# Altium PCB Light_SPT_Device_v1.0.PcbDoc (part 4 of 4)
Units mil, origin at the board's own origin, x right, y up, seen from the top; angles counter-clockwise.
Board outline 3454 x 2460 mil, 2 copper layers (Top Layer, Bottom Layer), stack 57 mil thick; 156 components, 115 nets, 552 pads, 270 vias.
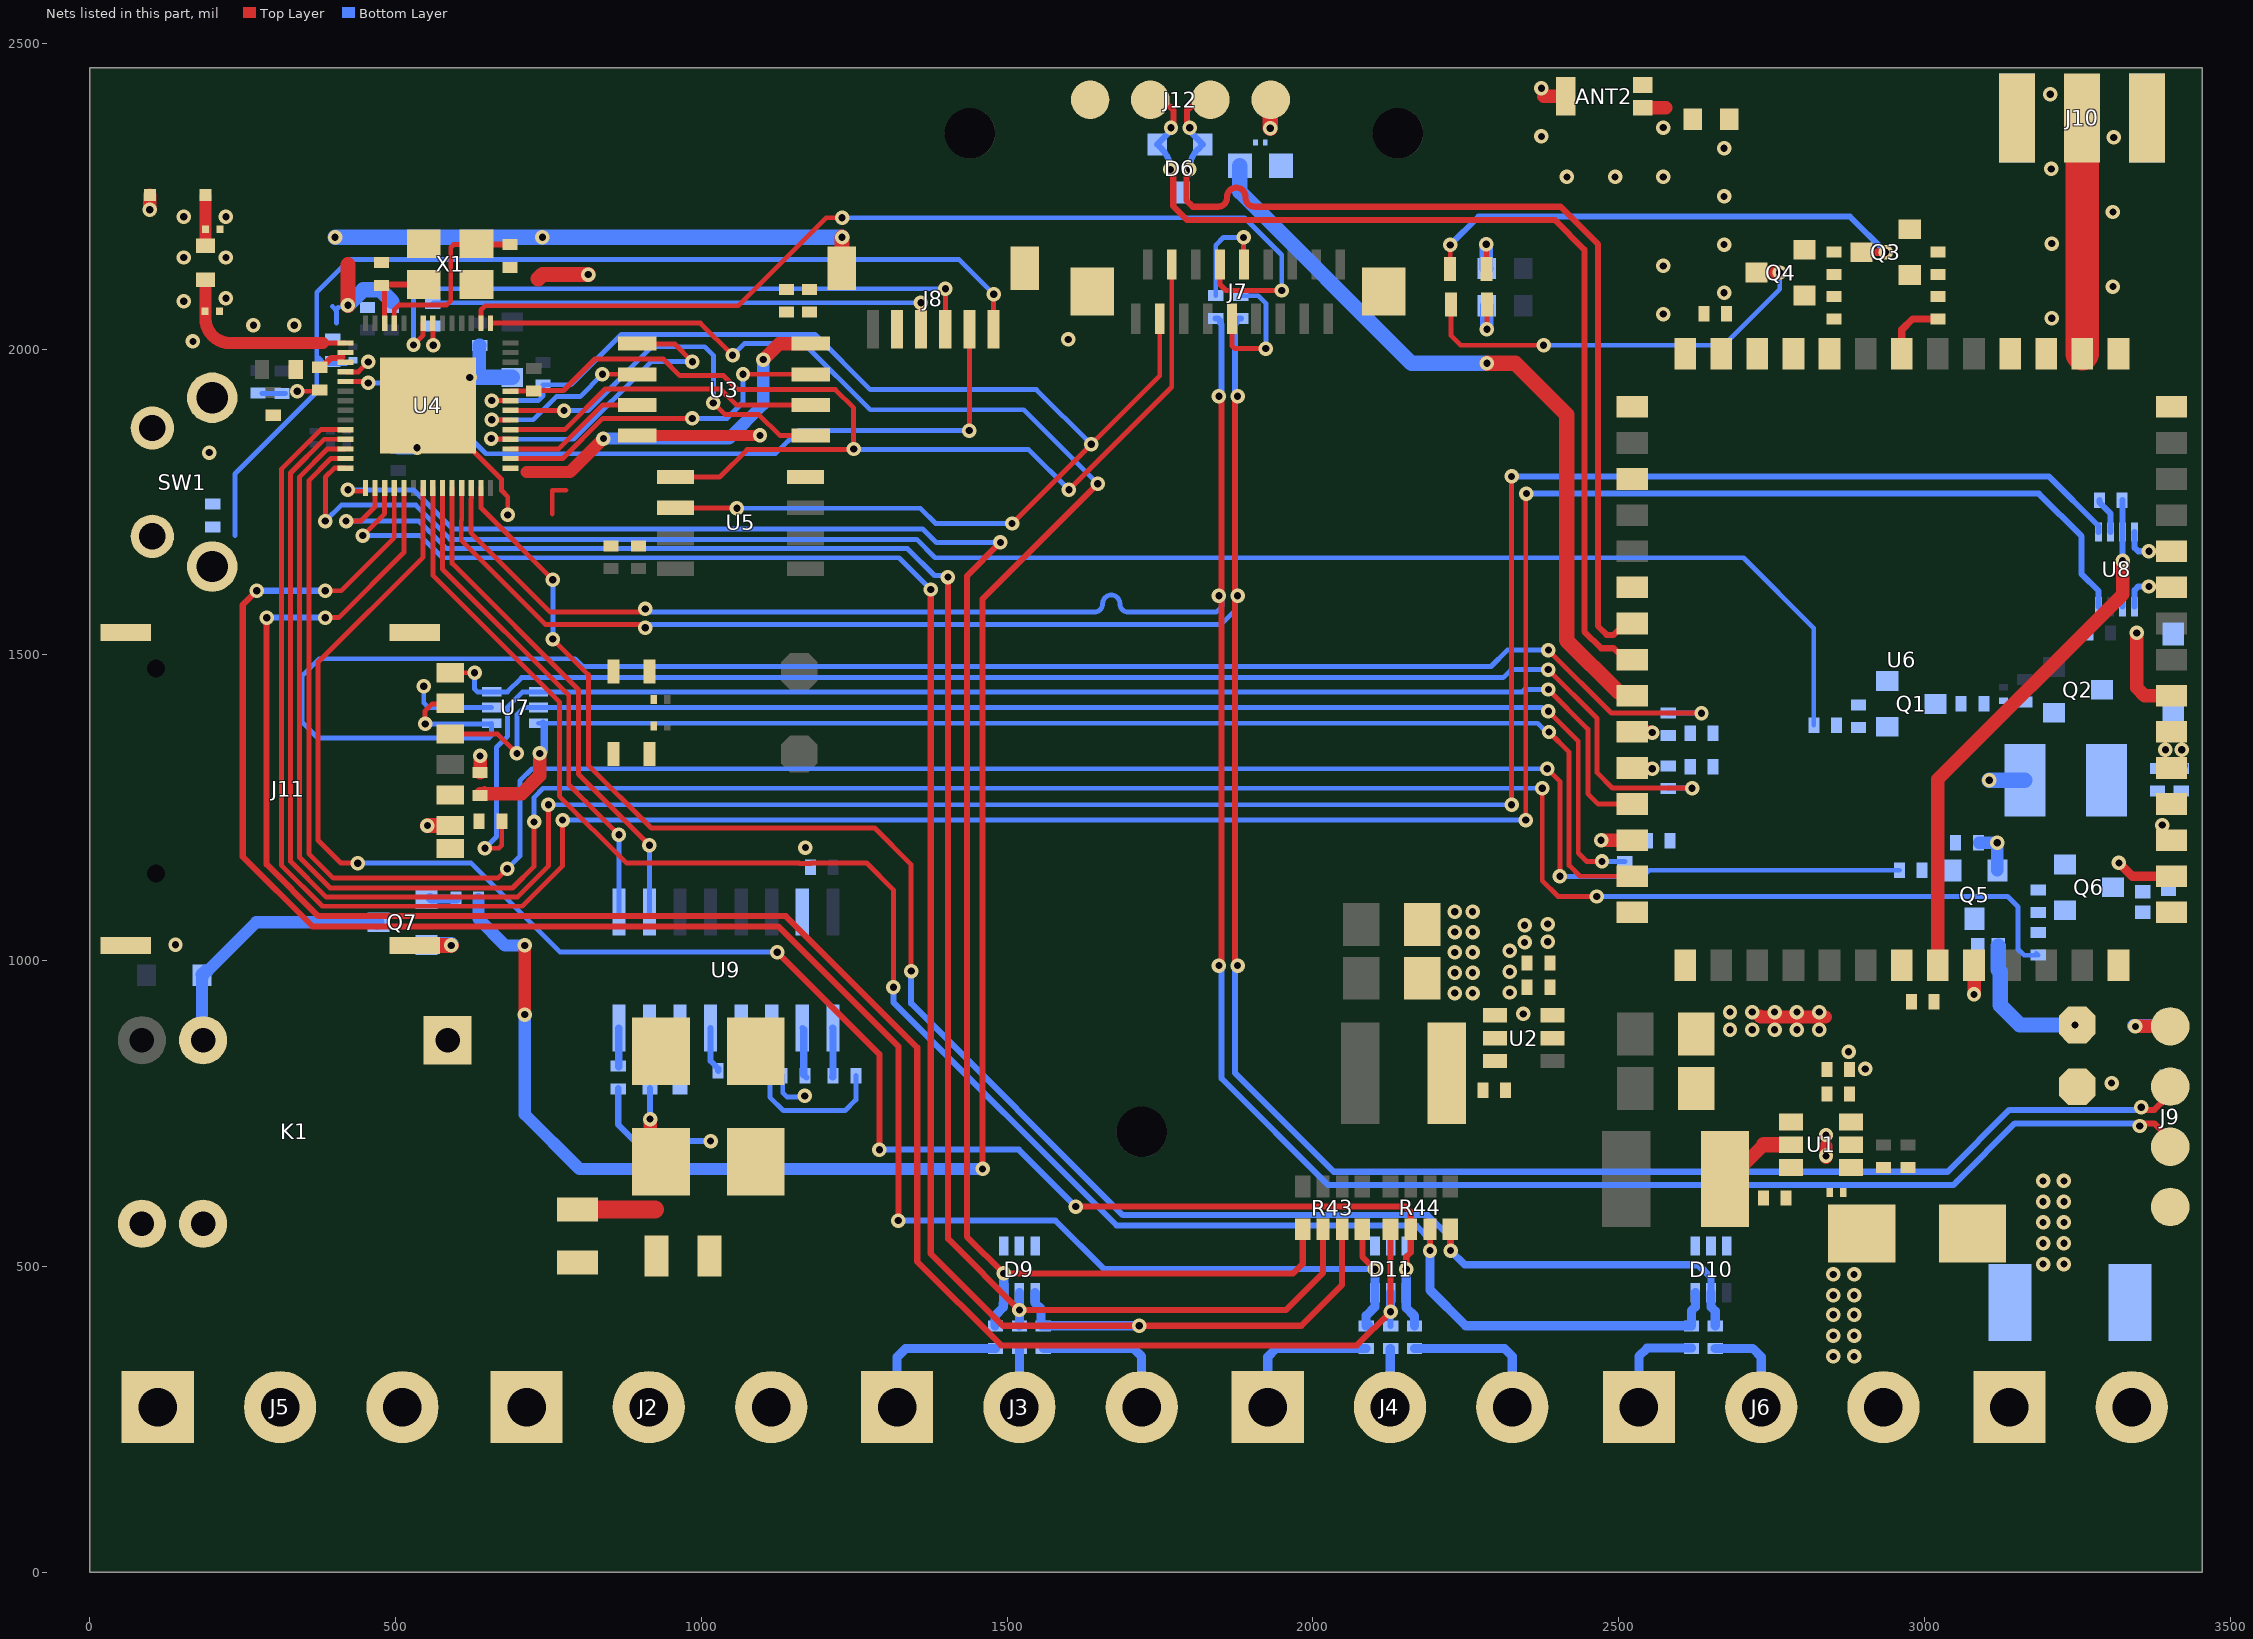
[diagram p2: the nets of this part, all layers, seen from the top]

## Via types
v1: diameter 23.62, hole 11.81, Top Layer to Bottom Layer, tented both sides, 204 vias
v2: diameter 23.62, hole 11.81, Top Layer to Bottom Layer, 66 vias

## Nets (pads, with @x,y where several pads share a name; then routed paths per layer and width w, separated by ;. In a path a pad name is that pad's centre, name@x,y a point inside that pad or via, vN(x,y) a via of type N, cw(c..) or ccw(c..) an arc to the next point about the centre after c; other vN are vias at no path point) (continued)
EN: C23.2 C24.2 J8.6 R8.1 SW1.2 SW1.3 U4.4 | length 1755.3
  Top Layer w8: U4.4@418.02,1962.96 439.09,1962.96 v1(455.31,1979.19) ; J8.6@1478,2033.52 1477.74,2033.78 1477.74,2089.74 v1(1478,2090)
  Bottom Layer w8: 237,1695.34 237,1796 371,1930 371,1986 371,2093 425,2147 1421,2147 v1(1478,2090) ; 374,1986 383.52,1976.48 418.5,1976.48
GND: Ant1.GND ANT2.2 ANT2.3 C2.1 C3.1 C5.1 C6.1 C8.1 C9.1 C10.1 C11.1 C12.1 C13.1 C14.1 C15.1 C16.1 C17.1 C18.1 C19.1 C20.1 C21.1 C22.1 C23.1 C24.1 C25.1 C26.1 C27.1 C28.1 C31.2 C32.1 C33.1 C34.1 C35.1 C36.1 C37.2 C38.2 C39.1 C40.1 C41.2 C42.2 C43.2 C46.2 C47.2 C48.1 C49.1 D1.1 D3.2 D4.1 D5.1 D6.3 D7.2 D8.2 D9.1 D9.2 D9.3 D10.1 D10.2 D10.3 D11.1 D11.2 D11.3 D13.1 D14.1 J1.1 J2.3 J6.3 J7.MP1 J7.MP2 J8.2 J8.MP1 J8.MP2 J9.4 J10.2 J10.3 J10.4 J10.5 J11.1 J11.2 J11.3 J11.4 J11.C5 J12.4 LED1.2 LED2.2 P4.1 Q1.2 Q3.2 Q4.2 Q5.2 Q6.2 Q7.2 R3.1 R17.1 R23.1 R27.1 R29.1 R31.1 SW1.1 SW1.4 U1.4 U2.4 U3.4 U4.57 U5.4 U6.1 U6.3 U6.6 U6.15 U6.16 U6.22 U6.28 U6.29 U6.31 U6.32 U6.35 U6.43 U6.44 U6.46 U6.47 U6.53 U6.54 U6.56 U7.2 U8.2 U9.15 X1.2 X1.4 | length 3052.9
  Top Layer w8: v1@337.93,1931.19 v1(338.93,1931.19) 373.69,1931.19 C18.1@376,1933.5 ; U4.57@552.87,1907.84 673.05,1787.66 673.05,1769.1 683.34,1758.81 v1(683.34,1729) v1@682.38,1729.96 ; 756,1730.36 756,1769.36 778.24,1769.36 ; v1(1600,2016) v1@1602,2018
  Top Layer w18: U3.4@895,1859 v1(1095.74,1859)
  Top Layer w22: v1(98,2228.19) Ant1.GND@98,2252 ; C38.2@638,1307.5 v2(638,1335) ; J7.MP2@2115.65,2094.13 J7.MP2@2116,2093.78 ; 2377.43,2413.43 ANT2.3@2413.49,2413.43 ; ANT2.2@2539.47,2394.73 2577,2394.73 ; 2731,909 2732,908 2838,908 ; v2@2839,678.81 v2(2839,680.81) 2839,697 ; v1(3347,1536) 3347,1446.22 3359.89,1433.33 U6.35@3403.89,1433.33
  Top Layer w25: v1(422,2072) 422,2138 ; J11.2@547,1025 v1(591,1025) ; v1(552,1221) 589.45,1221 J11.C5@589.5,1220.95 ; 733,2115 740,2122 v1(815,2122) ; J8.MP1@1229.45,2132.41 1230,2132.96 v1(1230,2183)
  Bottom Layer w8: C16.1@281,1928 281.25,1927.75 319.75,1927.75 C17.1@320,1927.5 ; 397.02,2069.59 402.31,2064.3 ; 401.81,2063.79 402.31,2064.3 ; 403.51,2042.37 403.51,2062.09 ; 406.52,2068.5 402.31,2064.3 ; v1(546,1449) 546,1421.69 553.69,1414 U7.2@657,1414 ; C47.2@1133,812 1133,784 1139.69,777.31 1167.31,777.31 v1(1169,779)
  Bottom Layer w10: C41.2@3286,1753 3286,1749.5 3304,1731.5 3304,1701.36 U8.2@3304.31,1701.05
  Bottom Layer w20: R29.1@3089,1193 v1(3119,1193) v1@3120,1193 ; Q5.2@3119,1147.77 v1@3119,1192.02
  Bottom Layer w22: C25.1@504,1838.5 504.25,1838.75 534.75,1838.75 v1(535,1839) ; v1@621.38,1954.24 636.83,1969.69 636.83,2006.2 C12.1@637.71,2006.2
  Bottom Layer w25: v1(401,2183) v1(740,2183) v1(1230,2183) ; v1(422,2072) 447,2097 475,2097 494,2078 ; Q7.2@550.51,1025.6 550.91,1026 v1@591,1026 ; v1(621.07,1953.93) D3.2@690.71,1953.93 ; v1(3106,1295) C31.2@3164.14,1295 ; D7.2@3120.73,1024 3120.73,985.27 C39.1@3124,982 3124,927 3156,895 v1(3246,895)
  other v1: 140,1026 1170,1185 3389,1221.89 195,1831 168.47,2012.81 267.37,2039.02 333.99,2039.02 3208.24,2050.67 2572.76,2057.49 153.54,2078.47 222.44,2083.36 2672.24,2092.41 3308.2,2102.34 2572.76,2136.23 153.54,2149.97 222.44,2149.97 2672.24,2171.15 3208.24,2172.72 153.54,2216.59 222.44,2216.59 3308.2,2224.39 2672.24,2249.89 2415.28,2281.71 2494.02,2281.71 2572.76,2281.71 3207.2,2294.76 2672.24,2328.63 3309.39,2346.43 2373.57,2348 2572.76,2362.45 3205.86,2416.8 2373.57,2426.74
  other v2: 2851,353 2885,353 2851,387 2885,387 2851,421 2885,421 2851,453 2885,453 2851,487 2885,487 2839,715 2682,887 2718.5,887 2755,887 2791.5,887 2828,887 2344,913 2682,916 2718.5,916 2755,916 2791.5,916 2828,916 2232,947 2261,947 2322,948 2232,980.25 2261,980.25 2322,982 2232,1013.5 2261,1013.5 2322,1016 2346,1030 2232,1046.75 2261,1046.75 2346,1058 2232,1080 2261,1080
GNSS_ANT: ANT2.1 C28.2 C29.2
GSM_BUCK_EN: R16.2 U4.14 | length 2798
  Top Layer w8: v1(385,1719) 385,1791 399.48,1805.48 U4.14@418.02,1805.48
  Bottom Layer w8: v1(385,1719) 411,1745 532.97,1745 588.97,1689 1352,1689 1382,1659 2704,1659 2819,1544 R16.2@2819,1385
GSM_PWR_EN: R30.2 U4.12 | length 3957.1
  Top Layer w8: U4.12@418.02,1836.98 388.55,1836.98 343,1791.43 343,1168.79 392.79,1119 691,1119 726.3,1154.3 v1(726.3,1227) ; v1(2375,1282) 2375,1131 2401,1105 v1(2464,1105)
  Bottom Layer w8: v1(726.3,1227) 726.3,1267.3 741,1282 v1(2375,1282) ; v1(2464,1105) 3136,1105 3153,1088 3153,1019 3163,1009 R30.2@3182.84,1009 ; R30.2@3182.84,1012.16 R30.2@3186,1009
GSM_RST: R28.2 U4.13 | length 3616.9
  Top Layer w8: U4.13@418.02,1821.23 394.02,1821.23 358,1785.21 358,1175 398,1135 667,1135 v1(682.3,1150.3) ; v1(2383.13,1313.99) 2403.81,1293.31 v1(2403.81,1138)
  Bottom Layer w8: v1(682.3,1150.3) 703,1171 703,1294 722.99,1313.99 v1(2383.13,1313.99) ; v1(2403.81,1138) 2540,1138 2550,1148 R28.2@2959,1148
GSM_RX: U6.39 U8.4 | length 97.3
  Top Layer w10: v1(3367,1669.55) U6.39@3403.89,1669.55 U6.39@3412.89,1669.55
  Bottom Layer w10: U8.4@3343.69,1701.05 3343.69,1675.41 3349.54,1669.55 v1(3367,1669.55)
GSM_TX: U6.38 U8.5 | length 99.4
  Top Layer w10: v1(3367,1612) 3411.39,1612 U6.38@3412.89,1610.5
  Bottom Layer w10: U8.5@3343.69,1579 3343.69,1606.14 3349.54,1612 v1(3367,1612)
GSM_USB_D_N: D6.2 J12.2 U6.7 | length 1648.4
  Top Layer w10: v1(1798,2294) ccw(c1808.86,2283.14) 1793.5,2283.14 1793.5,2243 1799.54,2236.96 1803.5,2233 1844.57,2233 ccw(c1844.57,2248) 1859.57,2248 1859.57,2249.32 cw(c1874.57,2249.32) 1889.57,2249.32 1889.57,2248 ccw(c1904.57,2248) 1904.57,2233 1939.57,2233 2405.11,2233 2466,2172.11 2466,1547.39 2480.47,1532.91 2491.66,1532.91 2510.19,1551.44 U6.7@2522,1551.44 ; v1(1798.52,2362) 1796.11,2364.41 cw(c1800.7,2369) 1794.21,2369 1794.21,2391 1796.21,2393 cw(c1820.35,2368.86) 1820.35,2403 ccw(c1820.35,2420.07) J12.2@1832.43,2408
  Bottom Layer w10: v1@1793.6,2298 1797.6,2294 v1(1798,2294) cw(c1843.87,2294) 1811.44,2326.44 D6.2@1820,2335 1802.43,2352.57 cw(c1811.86,2362) v1(1798.52,2362)
GSM_USB_D_P: D6.1 J12.3 U6.8 | length 1648.7
  Top Layer w10: J12.3@1734,2408 ccw(c1746.07,2420.07) 1746.07,2403 cw(c1746.07,2368.86) 1770.21,2393 1772.21,2391 1772.21,2369 cw(c1765.72,2369) 1770.31,2364.41 v1(1767.9,2362) ; v1(1767,2294) cw(c1756.14,2283.14) 1771.5,2283.14 1771.5,2233.89 1794.39,2211 2396,2211 2444,2163 2444,1538.27 2471.36,1510.91 2491.66,1510.91 2510.19,1492.39 U6.8@2522,1492.39
  Bottom Layer w10: v1(1767.9,2362) cw(c1757.53,2362) 1764.86,2354.67 D6.1@1745.2,2335 1753.43,2326.77 cw(c1720.65,2294) v1(1767,2294) 1767.6,2294 v1@1771.6,2298
IN_1: J5.2 K1.1
INPUT_1: J3.1 R32.1 | length 248.8
  Bottom Layer w15: J3.1@1319.75,269.75 1319.75,351.75 1333.75,365.75 R32.1@1480.75,365.75
INPUT_2: J3.2 R35.1 | length 95
  Bottom Layer w15: J3.2@1520.25,270.25 R35.1@1520.25,365.25
INPUT_3: J3.3 R38.1 | length 248.4
  Bottom Layer w15: R38.1@1559.75,365.75 1706.75,365.75 1719.75,352.75 J3.3@1719.75,269.75
INPUT_4: J4.1 R33.1 | length 248.8
  Bottom Layer w15: J4.1@1926,270 1926,352 1940,366 R33.1@2087,366
INPUT_5: J4.2 R36.1 | length 96.4
  Bottom Layer w15: J4.2@2126,270 2126.5,270.5 2126.5,365.5 R36.1@2127,366
INPUT_6: J4.3 R39.1 | length 248.4
  Bottom Layer w15: R39.1@2166,366 2313,366 2326,353 J4.3@2326,270
INPUT_7: J6.1 R34.1 | length 174.6
  Bottom Layer w15: J6.1@2533,270 2533,353 2546.5,366.5 R34.1@2619,366.5
INPUT_8: J6.2 R37.1 | length 162.8
  Bottom Layer w15: R37.1@2658,366 2719,366 2733,352 J6.2@2733,270
IO0: J8.5 U4.5 | length 1250.7
  Top Layer w8: U4.5@418.02,1947.21 453.05,1947.21 v1(455.31,1944.94) ; v1(1438,1867) 1438.06,1867.06 1438.06,2032.94 J8.5@1438.11,2033
  Bottom Layer w8: v1(455.31,1944.94) 531.8,1944.94 647.74,1829 1121,1829 1159,1867 v1(1438,1867)
IO1: D9.6 R32.2 R43.1 U4.15 | length 3023.9
  Top Layer w8: v1(422,1770) 424.19,1767.81 450.17,1767.81 450.5,1768.14 U4.15@450.5,1773
  Top Layer w10: v1(1489,1684) 1434,1629 1434,549 v1(1494.41,488.59) 1967.59,488.59 1983.24,504.24 R43.1@1983.24,561
  Bottom Layer w8: v1(422,1770) 529.19,1770 593.19,1706 1362,1706 1384,1684 v1(1489,1684)
  Bottom Layer w15: R32.2@1480,403 1480,419.59 1493.69,433.28 1493.69,439.71 1494.41,440.43 D9.6@1494.41,457 v1(1494.41,488.59)
IO2: D9.5 R35.2 R43.2 U4.16 | length 3029
  Top Layer w8: v1(419,1719) 419.13,1719.13 442.81,1719.13 466.25,1742.57 U4.16@466.25,1773
  Top Layer w10: v1(1403,1627.38) 1403.38,1627 1403.38,545.43 v1(1520,428.81) ; v1@1520.19,429 1956,429 2016.31,489.32 R43.2@2016.31,561
  Bottom Layer w8: v1(419,1719) 537.76,1719 554.76,1702 580.76,1676 582.76,1674 592,1674 1337,1674 1381.1,1629.9 1400.48,1629.9 v1(1403,1627.38)
  Bottom Layer w10: R35.2@1520,403 1520,422 v1(1520,428.81)
  Bottom Layer w15: R35.2@1520,403 D9.5@1520,457
IO3: D9.4 R38.2 R43.3 U4.17 | length 3202.7
  Top Layer w8: v1(446,1695.19) 482,1731.19 U4.17@482,1773
  Top Layer w10: v1(1375,1607.09) 1375,521 1493,403 v1(1716,403) 1981,403 2047.81,469.81 R43.3@2047.81,561
  Bottom Layer w8: v1(446,1695.19) 540.36,1695.19 576.55,1659 1323.09,1659 v1(1375,1607.09)
  Bottom Layer w15: D9.4@1545.59,457 1545.96,456.63 1545.96,440.06 1555.34,430.68 1555.34,404.5 1556.84,403 R38.2@1559,403 v1(1716,403)
IO4: D11.6 R33.2 R43.4 U4.18 | length 3261.2
  Top Layer w8: v1(385,1605) 411,1605 497.75,1691.75 U4.18@497.75,1773
  Top Layer w10: v1(273,1605) 250,1582 250,1170 364,1056 1126,1056 1322,860 v1(1322,575) ; R43.4@2080.44,561.44 R43.4@2080.88,561 2080.88,516.12 v1(2101.41,495.59)
  Bottom Layer w10: v1(273,1605) v1(385,1605) ; v1(1322,575) 1579,575 1658.41,495.59 v1(2101.41,495.59)
  Bottom Layer w15: R33.2@2090.36,404.5 2088.86,403 R33.2@2087,403 2087,419.59 2101.41,434 D11.6@2101.41,457 v1(2101.41,495.59)
IO5: D11.5 R36.2 R44.1 U4.19 | length 3357.9
  Top Layer w8: v1(385,1561) 407,1561 513.5,1667.5 U4.19@513.5,1773
  Top Layer w10: v1(289,1561) 289,1157.73 373.73,1073 1138,1073 1353,858 1353,508 1490,371 2072,371 v1(2127,426) ; v1@2126.81,426.19 R44.1@2126.81,561
  Bottom Layer w10: v1(289,1561) v1(385,1561) ; R36.2@2127,403 v1@2127,422
  Bottom Layer w15: v1@2127,422 D11.5@2127,457
IO6: D11.4 R39.2 R44.2 U4.21 | length 2979
  Top Layer w8: v1(438,1159.49) 410.65,1159.49 373,1197.14 373,1488 545,1660 U4.21@544.99,1773
  Top Layer w10: v1(1124,1014) 1291,847 v1(1291,691) ; v1(1612,598) 2151,598 2159.88,589.12 R44.2@2159.88,561 2159.88,522.88 2152.59,515.59 v1(2152.62,495.59) v1@2152.59,488.59
  Bottom Layer w8: v1(438,1159.49) 623.51,1159.49 769,1014 v1(1124,1014)
  Bottom Layer w10: v1(1291,691) 1519,691 v1(1612,598)
  Bottom Layer w15: v1(2152.62,495.59) D11.4@2152.59,457 2152.59,432.41 2166,419 R39.2@2166,403
IO7: D10.6 R34.2 R44.3 U4.22 | length 3048.2
  Top Layer w8: U4.22@560.74,1772.92 560.74,1630.26 767.81,1423.19 767.81,1269.19 877,1160 1159.74,1160 1160.55,1159.19 1179.45,1159.19 1180.26,1160 1270,1160 1314,1116 v1(1314,956.77)
  Top Layer w10: v1(2191.38,526) R44.3@2191.38,561
  Bottom Layer w10: v1(1314,956.77) 1314,932 1679,567 2169,567 2191.38,544.62 v1(2191.38,526)
  Bottom Layer w15: v1(2191.38,526) 2191.38,461.62 2250,403 R34.2@2619,403 ; R34.2@2619,403.5 2619,427.59 2625.41,434 D10.6@2625.41,457 D10.6@2625.04,456.63
IO8: D10.5 R37.2 R44.4 U4.27 | length 2972.2
  Top Layer w8: U4.27@639.48,1773 639.48,1740.6 v1(757,1623) ; v1(757,1526) 815.24,1467.76 815.24,1319.76 918,1217 1283.14,1217 1343,1157.14 v1(1343,983.14)
  Top Layer w10: R44.4@2224.45,561 2224.72,560.72 2224.72,526.28 v1(2225,526) ; v1@2225.22,524.78 v1@2226,524
  Bottom Layer w8: v1(757,1526) v1(757,1623)
  Bottom Layer w10: v1(1343,983.14) 1343,930.21 1689.21,584 2188,584 2225,547 v1(2225,526)
  Bottom Layer w12: v1(2225,526) 2248,503 2630,503 2651,482 D10.5@2651,457
  Bottom Layer w15: D10.5@2651,457 2651,434 2658,427 R37.2@2658,403
LED_DATA: J7.8 U4.44 | length 1615.9
  Top Layer w8: U4.44@639.48,2042.68 639.48,2064.31 646.17,2071 1060,2071 1204,2215 v1(1230,2215) ; J7.8@1847.93,2138.43 1847.93,2105.9 1857.83,2096 v1(1949,2096)
  Bottom Layer w8: v1@1229,2216 v1(1230,2215) 1888,2215 1949,2154 v1(1949,2096)
MCU_RX: U4.10 U8.8 | length 4542.4
  Top Layer w8: U4.10@418.02,1868.47 377.62,1868.47 313,1803.85 313,1156.36 380.36,1089 707,1089 773,1155 v1(773,1230) ; v1(2348,1230) 2348,1763 v1(2349,1764)
  Bottom Layer w8: v1(773,1230) v1(2348,1230)
  Bottom Layer w10: v1(2349,1764) 3187,1764 3257,1694 3257,1632.27 3284.63,1604.64 U8.8@3284.63,1579
MCU_TX: U4.11 U8.1 | length 4430.5
  Top Layer w8: U4.11@418.02,1852.72 383.08,1852.72 328,1797.64 328,1162.57 386.57,1104 699,1104 749.81,1154.81 v1(749.81,1254.93) ; v1(2324.88,1255) v1(2324.88,1792)
  Bottom Layer w8: v1(749.81,1254.93) 749.81,1255 v1(2324.88,1255)
  Bottom Layer w10: v1(2324.88,1792) 3203.52,1792 3284.63,1710.89 U8.1@3284.63,1701.05
NC_1: J5.1 K1.3 | length 26.3
  Top Layer w70: J5.1@111,270 J5.1@129.61,288.61
NetANT1_ANT#: Ant1.ANT# C48.2 L4.1 | length 83
  Top Layer w20: L4.1@189,2169 C48.2@189,2196 Ant1.ANT#@189,2252
NetC1_1: C1.1 L1.1 U1.5 | length 120.7
  Top Layer w22: L1.1@2689,643 2689,651 2737,699
  Top Layer w25: 2737,699 U1.5@2781.81,699
NetC1_2: C1.2 U1.6
NetC4_1: C4.1 R1.1 R3.2 U1.1
NetC7_1: C7.1 L2.1 U2.5
NetC7_2: C7.2 U2.6
NetC18_2: C18.2 L3.2 U4.2 U4.3 | length 44
  Top Layer w10: C18.2@376,1970.5 379.5,1970.5 383.5,1974.5 394.87,1985.87 411.37,1985.87 413,1987.5
NetC29_1: C29.1 U6.55
NetC30_1: C30.1 Q2.1 R14.1 R15.1
NetC31_1: C31.1 C32.2 C33.2 D4.2 Q2.3 U6.33 U6.34 | length 5.7
  Top Layer w22: U6.33@3415.7,1315.22 U6.33@3419.73,1319.25
  other v1: 3394,1345 3420.73,1345
NetC34_2: C34.2 R18.2 U6.10 | length 33.5
  Top Layer w22: U6.10@2522,1374.28 2522.97,1373.31 2554.69,1373.31 v1(2555,1373)
NetC35_2: C35.2 R19.2 U6.11 | length 33.5
  Top Layer w22: U6.11@2522,1315.22 2522.91,1314.31 2554.69,1314.31 v1(2555,1314)
NetC36_2: C36.2 R20.2 U6.13 | length 50.7
  Top Layer w22: v1@2471.28,1197.11 U6.13@2522,1197.11
  other v1: 2471.14,1196.97
NetC44_1: C44.1 U9.4 | length 63.5
  Bottom Layer w10: C44.1@1064,827 1065,828 U9.4@1065,890.12
NetC44_2: C44.2 U9.5 | length 75.3
  Bottom Layer w10: U9.5@1015,890.12 1015,836 1027.5,823.5 C44.2@1027.5,820
NetC45_1: C45.1 U9.1 | length 80.3
  Bottom Layer w12: C45.1@1215,810 1215.25,810.25 1215.25,889.87 U9.1@1215,890.12
NetC45_2: C45.2 U9.3 | length 310.7
  Bottom Layer w8: U9.3@1115,890.12 1112,887.12 1112,777 1134,755 1235,755 1252.5,772.5 C45.2@1252.5,812
NetC46_1: C46.1 U9.6 | length 62.5
  Bottom Layer w12: C46.1@964,828 965,829 U9.6@965,890.12
NetC47_1: C47.1 U9.2 | length 84
  Bottom Layer w10: U9.2@1165,890.12 U9.2@1167.5,887.62 ; C47.1@1167.5,813.5 C47.1@1172,809
  Bottom Layer w12: C47.1@1167.5,813.5 U9.2@1167.5,887.62
NetC49_2: C49.2 L4.2 U4.1 | length 315.7
  Top Layer w8: 381,2010.2 U4.1@418.02,2010.2
  Top Layer w20: L4.2@189,2113.88 189,2049.78 ccw(c228.57,2049.78) 228.57,2010.2 381,2010.2
NetD2_2: D2.2 J9.1 | length 118.7
  Top Layer w22: v1(3345,892.64) J9.1@3402,892.64
  Bottom Layer w22: v1@3342.31,893.39 3342.75,892.95 3343.8,894 3398.72,894 D2.2@3402,897.28
NetD5_2: D5.2 F2.2 J12.1 | length 48.1
  Top Layer w8: J12.1@1930.06,2408.21 J12.1@1930.85,2409
  Top Layer w25: v1(1930.06,2361.28) J12.1@1930.06,2408.21
NetD12_2: D12.2 K1.4 Q7.3 | length 435.7
  Bottom Layer w20: D12.2@182.64,977.33 189.02,983.72 192.72,983.72 272,1063 467,1063 469.39,1060.61 Q7.3@471.77,1063 ; K1.4@185,870 183.28,871.72 D12.2@183.28,976 D12.2@185,974.28
NetD13_2: D13.2 F3.2 R41.1 | length 221.7
  Bottom Layer w10: R41.1@864,791.5 864,732 891,705 v1(1015,705)
NetD14_2: D14.2 F4.2 R42.1 | length 249.9
  Top Layer w22: v1(916,741) 916,670 D14.2@917,669
  Top Layer w30: F4.2@797,593.31 924,593.31
  Bottom Layer w10: v1(916,741) R42.1@916,791.5
NetF1_1: F1.1 J1.2
NetJ7_9: J7.9 R9.1 | length 221.8
  Top Layer w8: J7.9@1867.61,2049.84 1867.61,2005.39 1872,2001 v1(1923,2001)
  Bottom Layer w8: R9.1@1882,2087.5 1910.5,2087.5 1923,2075 v1(1923,2001)
NetJ7_10: J7.10 R10.1 | length 178.1
  Top Layer w8: v1(1886.65,2182.82) 1886.65,2139.07 J7.10@1887.3,2138.43
  Bottom Layer w8: R10.1@1841,2087.5 1841,2170 1853.82,2182.82 v1(1886.65,2182.82)
NetLED1_1: LED1.1 R2.1
NetLED2_1: LED2.1 R4.1
NetLED3_1: LED3.1 R21.2 | length 80.1
  Top Layer w8: LED3.1@2283.53,2131 v1(2283.53,2171.47)
  Bottom Layer w22: v1(2283.53,2171.47) 2283.76,2171.24 2283.76,2132.24 R21.2@2284,2132
NetLED3_2: LED3.2 Q3.3 | length 834
  Top Layer w8: LED3.2@2224.47,2131 v1(2224.47,2170.53)
  Top Layer w12: Q3.3@2897.26,2158.6 v1(2936.4,2158.6)
  Bottom Layer w10: v1(2224.47,2170.53) 2270.94,2217 2878,2217 v1(2936.4,2158.6)
NetLED4_1: LED4.1 R24.2 | length 79.2
  Top Layer w8: v1(2284.53,2032.53) LED4.1@2284.53,2073
  Bottom Layer w22: R24.2@2284,2071 2284.26,2070.74 2284.26,2032.79 v1(2284.53,2032.53)
NetLED4_2: LED4.2 Q4.3 | length 704.8
  Top Layer w8: LED4.2@2225.47,2073 2225.47,2022.53 2241.6,2006.4 2377.4,2006.4 v1@2383.4,2006.4
  Top Layer w22: Q4.3@2725.26,2125.4 v1(2763.4,2125.4)
  Bottom Layer w8: v1(2377.19,2006.4) 2377.4,2006.4 2671.8,2006.4 2763.4,2098 v1(2763.4,2125.4)
NETLIGHT: R26.1 U6.52
NetQ1_1: Q1.1 R16.1 R17.2
NetQ1_3: Q1.3 R14.2
NetQ3_1: Q3.1 R22.2 R23.2
NetQ4_1: Q4.1 R26.2 R27.2
NetQ5_1: Q5.1 R28.1 R29.2
NetQ6_1: Q6.1 R30.1 R31.2
NetQ7_1: Q7.1 R40.2 | length 44.6
  Bottom Layer w15: Q7.1@556,1103 558.3,1100.7 599.2,1100.7 R40.2@599.5,1101
NetR5_1: R5.1 U4.49 | length 36.4
  Top Layer w8: U4.49@560.74,2042.68 561.06,2042.36 561.06,2006.83 v1(561.39,2006.51)
NetR41_2: R41.2 U9.8 | length 63.8
  Bottom Layer w8: R41.2@865,826.67 R41.2@865.28,826.39
  Bottom Layer w12: R41.2@865,826.67 U9.8@865,890.12
NetR42_2: R42.2 U9.7 | length 62.9
  Bottom Layer w12: U9.7@915,890.12 915.5,889.62 915.5,829.5 R42.2@917,828
NO_1: J5.3 K1.2 | length 1.4
  Top Layer w70: J5.3@510,271 J5.3@511,270
OLED/ENC_SCL: J7.3 R7.1 U4.36 U5.6 | length 2136.4
  Top Layer w8: v1@657.14,1915.86 687.57,1915.86 U4.36@687.71,1915.72 ; U5.6@957.7,1741 958.2,1740.5 1057.5,1740.5 v1(1058,1740) ; v1(1508,1715) 1749.5,1956.5 J7.3@1749.5,2049.84
  Bottom Layer w8: v1(657,1916) 733,1916 741,1924 R7.1@741,1941.25 741.56,1941.81 786.81,1941.81 869.23,2024.23 1185.77,2024.23 1276,1934 1547.84,1934 v1(1637.42,1844.42) ; v1(1058,1740) 1358,1740 1383,1715 v1(1508,1715)
OLED/ENC_SDA: J7.4 R6.1 U4.37 U5.5 | length 1812.6
  Top Layer w8: U4.37@687.71,1931.46 R6.1@725.59,1931.46 726.52,1932.4 774.4,1932.4 826,1984 937.72,1984 964.86,1956.86 1036.14,1956.86 1059,1934 1219,1934 1249,1904 1249,1835.81 1074.81,1835.81 1030,1791 U5.5@957.7,1791 ; v1(1601,1770) 1769.19,1938.19 J7.4@1769.19,2138.43
  Bottom Layer w8: v1(1249,1836.81) 1249,1835.81 1535.19,1835.81 v1(1601,1770)
PWRKEY: C40.2 D8.1 Q6.3 U6.30 | length 95
  Top Layer w15: v1(3318,1160) 3339.94,1138.06 U6.30@3403.89,1138.06
RELAY: R40.1 U4.43 | length 3512.3
  Top Layer w8: U4.43@655.23,2051.15 U4.43@655.23,2042.68 998.31,2042.68 v1(1051,1990)
  Top Layer w10: v1(1459.81,659.55) 1459.81,1591.81 v1(1648,1780)
  Top Layer w20: v1(711,912) v1(711,1025)
  Bottom Layer w8: v1(1051,1990) 1070.23,2009.23 1167.77,2009.23 1276,1901 1527,1901 v1(1648,1780)
  Bottom Layer w20: R40.1@635.5,1101 635.5,1068.5 679,1025 v1(711,1025) ; v1(711,912) 711,749 800.45,659.55 v1(1459.81,659.55)
RF_ANT: J10.1 U6.45 | length 374.1
  Top Layer w55: U6.45@3258.22,1992.39 J10.1@3258.22,2366.46
RS232_RX: F4.1 J2.1
RS232_TX: F3.1 J2.2
RST_GSM: C39.2 D7.1 Q5.3 U6.24 | length 47.4
  Top Layer w22: v1(3081.06,944.94) U6.24@3081.06,992.39
RXD: J8.4 U4.50 | length 1063.5
  Top Layer w8: v1(529.19,2007) 544.99,2022.8 U4.50@544.99,2042.68 ; J8.4@1398.74,2033 1398.87,2033.13 1398.87,2098.68 v1(1399,2098.81)
  Bottom Layer w8: v1(529.19,2007) 529.19,2088.19 539.81,2098.81 v1(1399,2098.81)
RXD_RS232: U4.23 U9.9 | length 812.6
  Top Layer w8: U4.23@576.49,1773 576.49,1640.51 783,1434 783,1288.21 811.11,1260.11 v1@865.11,1206.11
  Bottom Layer w8: U9.9@865,1079.88 v1(865,1206)
SIM_CD: J11.CD R25.2 U6.12 U7.4 | length 2305.3
  Top Layer w8: v1(646,1184) 668.81,1184 673.5,1188.69 R25.2@673.5,1228 ; v1(2385,1443.49) 2449.69,1378.8 2449.69,1273.31 2466.83,1256.17 U6.12@2522,1256.17
  Bottom Layer w8: v1(646,1184) 664.97,1202.97 664.97,1348.97 683.19,1367.19 683.19,1415.19 707.65,1439.65 733.32,1439.65 U7.4@733.38,1439.59 2342.38,1439.59 2346.27,1443.49 v1(2385,1443.49)
SIM_CLK: J11.C3 R19.1 U7.3 | length 2248.9
  Top Layer w8: J11.C3@589.5,1470.95 J11.C3@589.5,1470.95 631,1471 v1@632,1471 ; v1(2384.67,1476.07) 2464.69,1396.06 2464.69,1307.31 2489.81,1282.19 v1(2620,1282.19)
  Bottom Layer w8: v1(629,1471) 629,1444.28 633.69,1439.59 682.59,1439.59 706,1463 2311,1463 2324.07,1476.07 v1(2384.67,1476.07) ; R19.1@2581,1281.5 2581.69,1282.19 v1(2620,1282.19)
SIM_DATA: J11.C7 R18.1 U7.1 | length 3008.5
  Top Layer w8: v1(548.25,1387.32) 548.25,1408.57 559.74,1420.06 588.6,1420.06 J11.C7@589.5,1420.95 ; v1(2385,1508) 2488.18,1404.82 v1(2635.41,1404.82)
  Bottom Layer w8: v1(548.25,1387.32) U7.1@657,1387.32 ; U7.1@657,1388.41 657,1368.69 652.31,1364 373,1364 347,1390 347,1466 374.81,1493.81 793.17,1493.81 805.79,1481.19 2291.19,1481.19 2318,1508 v1(2385,1508) ; R18.1@2581,1405.5 2581.34,1405.16 2635.07,1405.16 v1(2635.41,1404.82)
SIM_RST: J11.C2 R20.1 U7.5 | length 2207.1
  Top Layer w8: J11.C2@596.19,1370.95 666.24,1370.95 v1(698.19,1339) ; v1(2385,1408) 2433.81,1359.19 2433.81,1176.19 2447.66,1162.34 v1(2472.66,1162.34)
  Bottom Layer w8: v1(698.19,1339) 698.19,1402.5 709.69,1414 U7.5@733.38,1414 2374.77,1414 2380.77,1408 v1(2385,1408) ; v1@2472.34,1162.34 v1(2472.66,1162.34) 2472.81,1162.5 R20.1@2510,1162.5
SIM_VDD: C38.1 J11.C1 R25.1 U6.14 U7.6 | length 2207.2
  Top Layer w8: v1(2386,1374) 2418.81,1341.19 2418.81,1155.93 2436.69,1138.05 U6.14@2522,1138.05
  Top Layer w10: C38.1@640,1270.5 640,1273 640,1275.51 645,1280.51
  Top Layer w22: C38.1@638,1273 640,1273 706,1273 735.78,1302.78 v1(735.78,1339)
  Bottom Layer w8: U7.6@733.38,1388.41 740.9,1388.41 2367.36,1388.41 2381.77,1374 v1(2386,1374)
  Bottom Layer w12: U7.6@740.9,1388.41 742.78,1386.54 v1@742.78,1341.22
SPICLK: U3.6 U4.33 | length 529.5
  Top Layer w8: U4.33@687.71,1868.47 776.28,1868.47 842.81,1935 1031,1935 1057,1909 U3.6@1178.86,1909
SPICS0: U3.1 U4.32 | length 516.4
  Top Layer w8: v1(656.28,1853.81) 657.03,1853.06 687.38,1853.06 U4.32@687.71,1852.72 ; U3.1@895,2009 895.5,2008.5 956.47,2008.5 v1(985.3,1979.67)
  Bottom Layer w8: v1(656.28,1853.81) 657.36,1852.72 790.72,1852.72 917.67,1979.67 v1(985.3,1979.67)
SPID: U3.5 U4.35 | length 640
  Top Layer w8: U4.35@687.71,1899.97 687.83,1899.85 775.15,1899.85 v1(775.28,1899.72) ; v1(1019.51,1912.19) 1038.7,1893 1094,1893 1128,1859 U3.5@1178.86,1859
  Bottom Layer w8: v1(775.28,1899.72) 814.72,1899.72 919,2004 1005.31,2004 1019.51,1989.8 v1(1019.51,1912.19)
SPIHD: U3.7 U4.30 | length 575.2
  Top Layer w8: U4.30@687.71,1821.23 773.31,1821.23 838.89,1886.81 v1(985,1886.81) ; v1(1068,1959) U3.7@1178.86,1959
  Bottom Layer w8: v1(985,1886.81) 1041.81,1886.81 1068,1913 v1(1068,1959)
SPIQ: U3.2 U4.34 | length 300.8
  Top Layer w8: v1@655.65,1884.22 U4.34@687.71,1884.22 ; v1(838,1959) U3.2@895,1959
  Bottom Layer w8: v1(657,1884.7) 724.91,1884.7 762.75,1922.54 801.54,1922.54 v1(838,1959)
SPIWP: U3.3 U4.31 | length 236.8
  Top Layer w8: U4.31@688.02,1836.98 766.66,1836.98 838.69,1909 U3.3@895,1909
STATUS: R22.1 U6.50 | length 104.9
  Top Layer w12: U6.50@2962.94,1992.39 2962.94,2031.94 2980.5,2049.5 R22.1@3021,2049.5
TXD: J8.3 R5.2 | length 842
  Top Layer w8: v1(1359,2076) 1359.19,2075.81 1359.19,2033.18 J8.3@1359.37,2033
  Bottom Layer w8: R5.2@560.74,2074.68 562.06,2076 v1(1359,2076)
TXD_RS232: U4.24 U9.10 | length 826.8
  Top Layer w8: U4.24@592.24,1773 592.24,1649.76 798.9,1443.1 798.9,1305.1 v1(915,1189)
  Bottom Layer w8: U9.10@915,1079.88 v1(915,1189)
USB_N: J9.2 R9.2 U4.25 | length 4369
  Top Layer w8: U4.25@607.98,1773 607.98,1720.75 607.24,1720 607.24,1687.48 744.72,1550 902.69,1550 v1(908,1544.69)
  Top Layer w10: v1(1876.81,992) 1872.5,996.31 v1@1872.5,1601.31 ; v1(1876.81,1597) v1@1872.5,1601.31 ; v1(1876.81,1923) 1872.5,1918.69 v1@1872.5,1601.31 ; v1(3354.45,760.31) 3358.76,756 3376,756 3397,777 3397,789.21 J9.2@3402,794.21
  Bottom Layer w8: v1(908,1544.69) 913.31,1550 1849.94,1550 1871.5,1571.56 1871.5,1591.69 v1(1876.81,1597) v1@1876.81,1595.36
  Bottom Layer w10: v1(1876.81,992) 1872.5,987.69 1872.5,816.5 2034,655 3037.89,655 3138.89,756 3350.13,756 v1(3354.45,760.31) ; v1(1876.81,1923) 1874.5,1923 1872.5,1925 1872.5,2040.64 1874.5,2042.64 1874.5,2046.5 1878.5,2050.5 R9.2@1882,2050.5
USB_P: J9.3 R10.2 U4.26 | length 4371.3
  Top Layer w8: U4.26@623.73,1773 623.73,1756.2 623,1755.47 623,1700 753,1570 902.69,1570 v1(908,1575.31)
  Top Layer w10: v1(1846.19,992) 1850.5,996.31 v1@1850.5,1601.31 ; v1(1846.19,1597) v1@1850.5,1601.31 ; v1(1846.19,1923) 1850.5,1918.69 v1@1850.5,1601.31 ; v1(3352,729.69) 3356.31,734 3376,734 3397,713 3397,700.79 J9.3@3402,695.79
  Bottom Layer w8: v1(908,1575.31) 913.31,1570 1638.18,1570 1642.18,1570 ccw(c1642.18,1584) 1656.18,1584 cw(c1670.18,1584) 1684.18,1584 ccw(c1698.18,1584) 1698.18,1570 1729.7,1570 1841.66,1570 1851.5,1579.84 1851.5,1591.69 v1(1846.19,1597)
  Bottom Layer w10: R10.2@1841,2050.5 1844.5,2050.5 1848.5,2046.5 1848.5,2042.64 1850.5,2040.64 1850.5,1925 1848.5,1923 v1(1846.19,1923) ; v1(1846.19,992) 1850.5,987.69 1850.5,807.39 2024.89,633 3047,633 3053.44,639.44 3148,734 3347.69,734 v1(3352,729.69)
USB_VBUS: F2.1 U6.9 | length 1241.1
  Top Layer w22: U6.9@2498.95,1440.05 2515.28,1440.05 U6.9@2522,1433.33
  Top Layer w25: v1@2285,1977 2331,1977 2415,1893 2415,1524 U6.9@2498.95,1440.05
  Bottom Layer w25: F2.1@1880.54,2300 1880.54,2257.46 2161,1977 v1(2284.53,1977)
VCC: C2.2 C3.2 C8.2 C9.2 D1.2 D2.1 F1.2 P1.1 U1.2 U1.3 U2.2 U2.3
  other v2: 3194,504 3228,504 3194,538 3228,538 3194,572 3228,572 3194,606 3228,606 3194,640 3228,640 3306,800 2903,823 2876,851 2384,1031 2384,1060
VDD_EXT: C37.1 C41.1 U6.23 U8.3 U8.6 | length 964.6
  Top Layer w22: U6.23@3022,996.32 U6.23@3022,992.39 3022,1297 3324,1599 v1(3324,1654)
  Bottom Layer w10: U8.6@3324,1579 v1(3324,1654) U8.3@3324,1701.05 C41.1@3324,1753
VDD_SPI: C21.2 C22.2 U3.8 U4.29 | length 594.6
  Top Layer w20: 714,1799 785,1799 v1(839.81,1853.81)
  Top Layer w22: v1(1101,1983) 1127,2009 U3.8@1178.86,2009
  Bottom Layer w20: v1(839.81,1853.81) 840,1854 1045,1854 1101,1910 v1(1101,1983)
XTAL_IN: C26.2 U4.54 X1.1 | length 133.6
  Top Layer w8: C26.2@477,2105.54 C26.2@477,2104.5 482,2099.5 U4.54@482,2042.68
  Top Layer w10: C26.2@477,2105.54 X1.1@545.69,2105.54
XTAL_OUT: C27.2 U4.53 X1.3 | length 307.1
  Top Layer w8: U4.53@497.75,2042.68 497.75,2064.75 505,2072 583,2072 590,2079 590,2166.31 594.69,2171 X1.3@632.31,2171
  Top Layer w10: X1.3@632.31,2172.46 633.77,2171 C27.2@687,2171
pads on no net: D10.4 J7.11 J7.12 J7.13 J7.14 J7.15 J7.16 J7.17 J7.18 J11.C6 J11.MH U4.8 U4.28 U4.38 U4.39 U4.40 U4.41 U4.42 U4.45 U4.47 U4.48 U4.51 U4.52 U5.1 U5.2 U5.3 U5.7 U6.2 U6.4 U6.5 U6.17 U6.18 U6.19 U6.20 U6.21 U6.25 U6.26 U6.27 U6.36 U6.37 U6.40 U6.41 U6.42 U6.48 U6.49 U6.51 U9.11 U9.12 U9.13 U9.14

## Polygon pours and split planes (outlines as drawn)
GND on Bottom Layer "Bottom Layer-No Net" (solid, remove dead copper, pour order 5): 45.01,167.98 cw(c44.99,167.97) 44.98,168 44.98,2237.98 cw(c45.01,2237.98) 45.01,2238.02 1253,2238.02 1253,2414 3408,2414 3408,76.01 45.01,76.01 cw(c86.6,121.99)
GND on Top Layer "Bottom Layer-No Net" (solid, remove dead copper, pour order 4): 45.01,167.98 cw(c44.99,167.97) 44.98,168 44.98,2237.98 cw(c45.01,2237.98) 45.01,2238.02 1253,2238.02 1253,2414 3408,2414 3408,76.01 45.01,76.01 cw(c86.6,121.99)

## Other copper
Top Layer:
  rectangle net IN_1: 509,583 640,909.37
  rectangle net IN_1: 248,513 640,638
  rectangle net IN_1: 248,210.94 373,638
  rectangle net NC_1: 23,210.94 170.06,473
  rectangle net NC_1: 23,210.94 126,617
  rectangle net GND: 384,2147 573,2196
  rectangle net VDD_SPI: 1120,1997 1211,2073
  rectangle net NetC18_2: 322,1951 351,1967
  rectangle net NetC18_2: 322,1960 389,1985
  rectangle net GND: 2360,2382 2429,2451
  region net GND: 770,2083 770,2140 604,2140 604,2083
  rectangle net GND: 712,2083 770,2196
  rectangle net 3V3: 2043,619 2124.81,1850
  rectangle net RS232_RX: 715,210.94 838,535
  region net 3V9: 2988,746 2912,746 2912,688 2988,688
  region net VCC: 2900,839 2860,839 2860,685 2900,685
  region net VCC: 2921,868 2860,868 2860,805 2921,805
  region net GND: 2853,931 2594,931 2594,738 2853,738
  rectangle net NetC7_1: 2187,733 2254,899
  rectangle net NetC7_1: 2246,733 2291,803
  region net NetC7_2: 2347.51,849 2302.51,849 2302.51,775 2347.51,775
  rectangle net NetC7_2: 2265,819 2347.51,849
  rectangle net NetC7_1: 2188,858 2319,885
  rectangle net GND: 2277,896 2359,1096
  region net 3V9: 2571,932 2460,932 2460,523 2571,523
  rectangle net 3V3: 2374,618 2450,848
  rectangle net VCC: 2371,861 2420,1072
  rectangle net GND: 2151,935 2355,1096
  region net NetC1_1: 2748,726 2630,726 2630,560 2748,560
  region net NetC1_2: 2802,675 2762,675 2762,597 2802,597
  region net NetC4_1: 2988,676 2860.39,676 2860.39,613 2988,613
  region net GND: 2853,758 2825,758 2825,613 2853,613
  region net STATUS: 2953.39,2059.33 2953.39,2029.33 3035,2029.33 3035,2059.33
  region net STATUS: 2972.78,2059.33 2942.78,2059.33 2942.78,1971 2972.78,1971
  rectangle net GNSS_ANT: 2595,2042 2650,2409.99
  rectangle net 3V3: 713,1957.46 735,1979.46
  rectangle net IO1: 407,1756 454,1787
  rectangle net RELAY: 651,2030 667,2056
  rectangle net 3V3: 272,1919 313,1985
  rectangle net 3V3: 238,1955 295,1985
  rectangle net RF_ANT: 3230.72,1965 3285.72,2011
  rectangle net GND: 474,1821 637,1840
  rectangle net GND: 629,1829 637,1986
  rectangle net GND: 2944.94,920 2988,1014
  rectangle net VDD_EXT: 3004,920 3040,1014
  rectangle net GND: 3374,1178.89 3434,1273.89
  rectangle net NetC31_1: 3379,1297 3434,1392
  rectangle net 3V3: 1968,613 2449,650
  rectangle net GND: 674,2123 770,2146
  rectangle net GND: 384,2128 493,2151
  region net 3V9: 1201.82,1398 936,1398 936,1295 1201.82,1295
  rectangle net 3V3: 936,1419 1201.82,1522
  rectangle net 3V3: 936,1466 989,1654
  rectangle net 3V3: 838,1628 989,1654
  rectangle net NetLED1_1: 901.47,1318 928.47,1393
  rectangle net NetLED2_1: 901.47,1419 928.47,1494
  rectangle net 3V3: 442,2026 470,2056
  rectangle net NetC18_2: 405.01,1977 431,1998
  rectangle net SIM_VDD: 625,1210 654,1287
  rectangle net SIM_CD: 567,1167 659,1198
  rectangle net SIM_VDD: 567,1255 653,1287
  rectangle net NetD13_2: 994,480 1138,726
  rectangle net NetD14_2: 868,576 983,727
  rectangle net RS232_TX: 854,210 977,550.46
  rectangle net GND: 3218,858 3282,929
  rectangle net VCC: 3218,764 3327,831
  rectangle net VCC: 3022,367 3246,831
  rectangle net NetC29_1: 2660,1969 2696,2072
  rectangle net NetQ4_1: 2786,2071 2865,2133
  rectangle net GND: 2786,2146 2865,2213
  rectangle net GND: 2957,2148 3035,2213
  rectangle net NetQ3_1: 2957,2076 3035,2138
  rectangle net NETLIGHT: 2835,1971 2865,2060
  region net GNSS_ANT: 2523,2445 2615,2445 cw(c2615,2410) 2650,2410 2650,2401 2595,2401 2595,2410 ccw(c2586,2410) 2586,2419 2523,2419
  region net 3V3: 713,1957 770,1957 787,1974 787,1992 713,1992
  pour cut-out: 2557,2458 2396,2458 2396,2285 2558,2285 2558,2458
  pour cut-out: 2041,707 2257,707 2258,707 2258,927 2041,927
  pour cut-out: 2471,742 2471,543.25 2721,543.25 2721,742 2470,742
  region net VDD_SPI: 731.5,1809 731.5,1719.36 702.5,1719.36 702.5,1809
  region net VDD_SPI: 675,1809 707,1809 707,1763.33
  pour cut-out: 0,27 0,978 707.86,978 707.86,27
Bottom Layer:
  rectangle net 3V3: 62,850 108.47,993.72
  rectangle net NO_1: 451,212 571,616
  rectangle net NO_1: 145.65,499 571,616
  region net 3V3: 786,2027 786,2060 586,2060 586,2027
  rectangle net 3V9: 2911,713 2987,749
  rectangle net NetD2_2: 3330,876 3430,933
  rectangle net SIM_VDD: 717,1326 761.75,1396
  rectangle net MCU_TX: 3274,1683 3291,1722
  rectangle net GND: 2360,2382 2429,2451
  rectangle net 3V3: 1211,1039 2120,1097
  rectangle net GND: 3107,956 3141,1044
  rectangle net NetD5_2: 1918,2278 1982,2375
  rectangle net 3V3: 335,1788.96 539,1816
  region net 3V3: 1227,965 1227,993 541.8,993 541.8,965
  rectangle net GND: 2093,518 2160,549
  rectangle net NetQ7_1: 530,1081 608,1120
  region net VCC: 2439,825.76 2439,1072 2368,1072 2368,825.76
  region net 3V9: 2987,738 2987,799 2459,799 2459,738
  region net VCC: 3430,809 3430,866 2368,866 2368,809
  rectangle net VCC: 3000,781 3430,859
  rectangle net EN: 370,1963.96 467,1991
  rectangle net 3V3: 2045.09,1039 2122,1143.88
  rectangle net GND: 1488,517 1553,549
  region net GND: 3203,197 3203,343 2863,343 2863,197
  rectangle net 3V3: 725,1966 791,2061
  rectangle net GND: 625.12,1995.2 651,2017.2
  rectangle net 3V3: 476,1964.69 508,2049.69
  rectangle net GND: 3344,1067 3414,1090
  rectangle net 3V3: 321,1790 433,1852
  rectangle net 3V3: 240,1952 333,1997
  rectangle net GND: 384,2006 413,2079
  rectangle net 3V3: 420,1998 450,2016
  rectangle net 3V9: 3086,1441 3230,1497
  rectangle net GND: 3365,1210 3435,1287
  rectangle net NetQ6_1: 3173,1033 3248,1098
  rectangle net GND: 2846,1409 2958,1474
  rectangle net NetQ1_1: 2846,1366 2958,1400
  rectangle net NetQ1_3: 2998,1402 3070,1440
  rectangle net NetC30_1: 3086,1389 3230,1433
  rectangle net NetQ5_1: 2987,1129 3064,1206
  rectangle net RST_GSM: 3059,932 3098,1088
  rectangle net PWRKEY: 3290,1102 3421,1177
  rectangle net NetC31_1: 3318,1305 3435,1461
  rectangle net NetC31_1: 3262,1236 3333,1461
  rectangle net EN: 66,1595 243,1724
  rectangle net NetC36_2: 2455,1183 2557.5,1212
  rectangle net NetC35_2: 2543,1301 2626,1332
  rectangle net NetC34_2: 2543,1357 2627,1388
  rectangle net 3V3: 441,1998 508,2050
  rectangle net NetR5_1: 548,1994 575,2052
  region net VCC: 3240,660 3094,660 3094,366 3240,366
  rectangle net IO2: 1509,394 1531,430
  rectangle net IO5: 2116,394 2138,430
  rectangle net NetF1_1: 3266,206 3412,510
  rectangle net GND: 1152,1039 1188,1205
  rectangle net 3V3: 1202,965 1227,1166
  region net 3V3: 335.5,1795 335.5,1788.5 286,1739 253,1739 253,1795
  region net 3V3: 253,1738 253,1795 310,1852 324,1852 324,1783
  region net GND: 261,1945 352,1945 352,1927 340,1915 261,1915
  region net GND: 508,2116 417,2116 384,2083 384,2058 508,2058
  pour cut-out: 0,27 0,978 661,978 661,27
  pour cut-out: 2557,2458 2396,2458 2396,2285 2558,2285 2558,2458

## Silkscreen, mask and mechanical layers (free items; w line width, h text height)
Top Overlay:
  drawing of 57 lines, arcs and shapes, not listed
  text "3V3" at 934.13,1443.69 h80
  text "3V9" at 934.13,1300.69 h80
  text "GND" at 3054.26,860.37 h75
  text "VCC" at 3053.23,756.37 h80
  text "RS232" at 613,36.41 h50
  text "NC" at 39.13,4.69 h80
  text "COM" at 239.13,4.69 h80
  text "NO" at 439.13,4.69 h80
  text "RX" at 613,4.69 h50
  text "TX" at 808,4.69 h50
  text "GND" at 1025,4.69 h50
  text "IN1" at 1249.13,4.69 h80
  text "IN2" at 1449.13,4.69 h80
  text "IN3" at 1649.13,4.69 h80
  text "IN4" at 1855.13,4.69 h80
  text "IN5" at 2055.13,4.69 h80
  text "IN6" at 2255.13,4.69 h80
  text "IN7" at 2462.13,4.69 h80
  text "IN8" at 2662.13,4.69 h80
  text "GND" at 2862.13,4.69 h80
  text "+" at 3042,4 h60
  text "9-30 VDC" at 3105.12,4 h60
  text "+" at 3358,4.42 h60
Bottom Overlay:
  drawing of 23 lines, arcs and shapes, not listed
  text "ZERO CARBON FOOTPRINT" at 2150,1196.77 h60
  text "V1.0" at 4.06,3.69 h80
Dimension:
  circle w10: c2138,2353 r98.43
  circle w10: c1438,2353 r98.43
  circle w10: c1720,720 r98.43
Top Board_outline/Bottom 3D Body:
  lines w3: 49.76,739 49.76,758.87 269.14,758.87 279.5,769.23 279.5,917.82 299.5,917.82 299.5,758.87 279.64,739 49.76,739 ; 200.26,157 220.26,157 220.26,353 200.26,353 200.26,157 ; 397.26,157 417.26,157 417.26,353 397.26,353 397.26,157 ; 414.04,818.13 434.04,818.13 434.04,926.77 444.4,937.13 653.28,937.13 663.65,926.77 663.65,511 683.65,511 683.65,937.13 663.78,957 433.9,957 414.04,937.13 414.04,818.13 ; 600.26,157 600.26,465 620.26,465 620.26,157 600.26,157
  lines w10: 0,0 0,2460 3454,2460 3454,0 0,0
Fabrication:
  drawing of 324 lines, arcs and shapes, not listed
  text "Layer" at 3773.74,2712.16 h60
  text "Name" at 4183.65,2712.16 h60
  text "Material" at 5113.39,2712.16 h60
  text "Thickness" at 5973.16,2712.16 h60
  text "Constant" at 6623,2712.16 h60
  text "Board Layer Stack" at 7192.86,2712.16 h60
  text "Top Overlay" at 4183.65,2592.16 h60
  text "Top Solder" at 4183.65,2472.16 h60
  text "Solder Resist" at 5113.39,2472.16 h60
  text "0.076mm" at 5973.16,2472.16 h60
  text "3.5" at 6623,2472.16 h60
  text "1" at 3773.74,2352.16 h60
  text "Top Layer" at 4183.65,2352.16 h60
  text "0.254mm" at 5973.16,2352.16 h60
  text "Dielectric 1" at 4183.65,2232.16 h60
  text "FR-4" at 5113.39,2232.16 h60
  text "0.940mm" at 5973.16,2232.16 h60
  text "4.8" at 6623,2232.16 h60
  text "2" at 3773.74,2112.16 h60
  text "Bottom Layer" at 4183.65,2112.16 h60
  text "0.254mm" at 5973.16,2112.16 h60
  text "Bottom Solder" at 4183.65,1992.16 h60
  text "Solder Resist" at 5113.39,1992.16 h60
  text "0.076mm" at 5973.16,1992.16 h60
  text "3.5" at 6623,1992.16 h60
  text "Bottom Overlay" at 4183.65,1872.16 h60
  text "Total board thickness:" at 3773.74,1752.16 h60
  text "1.600mm" at 5973.16,1752.16 h60
Drill Drawing:
  circle w10: c-197.38,4067.83 r33.33
  lines w10: -230.71,3134.5 -164.04,3134.5 -164.04,3201.17 -230.71,3201.17 -230.71,3134.5 ; -230.71,3284.5 -164.04,3284.5 -164.04,3351.17 -230.71,3351.17 -230.71,3284.5 ; -230.71,3434.5 -197.38,3451.17 -164.04,3434.5 -180.71,3467.83 -164.04,3501.17 -197.38,3484.5 -230.71,3501.17 -214.04,3467.83 -230.71,3434.5 ; -230.71,3617.83 -197.38,3584.5 -164.04,3617.83 -197.38,3651.17 -230.71,3617.83 ; -230.71,3734.5 -230.71,3751.17 -214.04,3767.83 -230.71,3784.5 -230.71,3801.17 -214.04,3801.17 -197.38,3784.5 -180.71,3801.17 -164.04,3801.17 -164.04,3784.5 -180.71,3767.83 -164.04,3751.17 -164.04,3734.5 -180.71,3734.5 -197.38,3751.17 -214.04,3734.5 -230.71,3734.5 ; -230.71,3901.17 -214.04,3901.17 -214.04,3884.5 -180.71,3884.5 -180.71,3901.17 -164.04,3901.17 -164.04,3934.5 -180.71,3934.5 -180.71,3951.17 -214.04,3951.17 -214.04,3934.5 -230.71,3934.5 -230.71,3901.17 ; -217.38,3147.83 -177.38,3147.83 -177.38,3187.83 -217.38,3187.83 -217.38,3147.83
  lines w15: -290.5,3089.5 6719.6,3089.5 ; -290.5,4139.5 6719.6,4139.5 ; 260.38,2939.5 260.38,4289.5 ; 850.22,2939.5 850.22,4289.5 ; 1949.9,2939.5 1949.9,4289.5 ; 2455.78,2939.5 2455.78,4289.5 ; 3189.58,2939.5 3189.58,4289.5 ; 4689.13,2939.5 4689.13,4289.5 ; 5278.98,2939.5 5278.98,4289.5 ; 6024.78,2939.5 6024.78,4289.5 ; -290.5,2939.5 6719.6,2939.5 6719.6,4289.5 -290.5,4289.5 -290.5,2939.5
  text "Symbol" at -200.5,4184.5 h72
  text "Count" at 305.38,4184.5 h72
  text "Hole Size" at 895.22,4184.5 h72
  text "Plated" at 1994.9,4184.5 h72
  text "Hole Type" at 2500.78,4184.5 h72
  text "Drill Layer Pair" at 3234.58,4184.5 h72
  text "Via/Pad" at 4734.13,4184.5 h72
  text "Pad Shape" at 5323.98,4184.5 h72
  text "Template" at 6069.78,4184.5 h72
  text "2" at 305.38,4034.5 h60
  text "0.750mm (29.53mil)" at 895.22,4034.5 h60
  text "NPTH" at 1994.9,4034.5 h60
  text "Round" at 2500.78,4034.5 h60
  text "Top Layer - Bottom Layer" at 3234.58,4034.5 h60
  text "Pad" at 4734.13,4034.5 h60
  text "Rectangle" at 5323.98,4034.5 h60
  text "s0hn75" at 6069.78,4034.5 h60
  text "2" at 305.38,3884.5 h60
  text "1.100mm (43.31mil)" at 895.22,3884.5 h60
  text "PTH" at 1994.9,3884.5 h60
  text "Round" at 2500.78,3884.5 h60
  text "Top Layer - Bottom Layer" at 3234.58,3884.5 h60
  text "Pad" at 4734.13,3884.5 h60
  text "Rounded" at 5323.98,3884.5 h60
  text "c180h110" at 6069.78,3884.5 h60
  text "2" at 305.38,3734.5 h60
  text "1.300mm (51.18mil)" at 895.22,3734.5 h60
  text "PTH" at 1994.9,3734.5 h60
  text "Round" at 2500.78,3734.5 h60
  text "Top Layer - Bottom Layer" at 3234.58,3734.5 h60
  text "Pad" at 4734.13,3734.5 h60
  text "Rounded" at 5323.98,3734.5 h60
  text "c210h130" at 6069.78,3734.5 h60
  text "3" at 305.38,3584.5 h60
  text "2.100mm (82.68mil)" at 895.22,3584.5 h60
  text "NPTH" at 1994.9,3584.5 h60
  text "Round" at 2500.78,3584.5 h60
  text "Top Layer - Bottom Layer" at 3234.58,3584.5 h60
  text "Pad" at 4734.13,3584.5 h60
  text "Rounded" at 5323.98,3584.5 h60
  text "c210hn210" at 6069.78,3584.5 h60
  text "5" at 305.38,3434.5 h60
  text "1.020mm (40.16mil)" at 895.22,3434.5 h60
  text "PTH" at 1994.9,3434.5 h60
  text "Round" at 2500.78,3434.5 h60
  text "Top Layer - Bottom Layer" at 3234.58,3434.5 h60
  text "Pad" at 4734.13,3434.5 h60
  text "(Mixed)" at 5323.98,3434.5 h60
  text "(Mixed)" at 6069.78,3434.5 h60
  text "17" at 305.38,3284.5 h60
  text "1.600mm (62.99mil)" at 895.22,3284.5 h60
  text "PTH" at 1994.9,3284.5 h60
  text "Round" at 2500.78,3284.5 h60
  text "Top Layer - Bottom Layer" at 3234.58,3284.5 h60
  text "Pad" at 4734.13,3284.5 h60
  text "(Mixed)" at 5323.98,3284.5 h60
  text "(Mixed)" at 6069.78,3284.5 h60
  text "270" at 305.38,3134.5 h60
  text "0.300mm (11.81mil)" at 895.22,3134.5 h60
  text "PTH" at 1994.9,3134.5 h60
  text "Round" at 2500.78,3134.5 h60
  text "Top Layer - Bottom Layer" at 3234.58,3134.5 h60
  text "Via" at 4734.13,3134.5 h60
  text "Rounded" at 5323.98,3134.5 h60
  text "(Mixed)" at 6069.78,3134.5 h60
  text "301 Total" at 305.38,2984.5 h60

## Dimensions
0,0 to 3454,0 on Dimension
0,2460 to 0,0 on Dimension

## Text inside footprints (layer, text, board x,y; h text height)
J7: Top Overlay "18" at 2064.46,2143.13 h19.68; Top Overlay "17" at 2044.46,2037.13 h19.68; Top Overlay "2" at 1698.46,2133.13 h19.68; Top Overlay "1" at 1686.46,2043.13 h19.68
J10: Top Overlay "PCB Edge" at 3305.2,2423.32 h11.81 r270
J11: Top Overlay "Board Edge" at 55.14,1435.8 h30 r270
K1: Top Overlay "1" at 590,811 h31.5 r180
SW1: Top Overlay "PCB Edge" at 17.4,1866.58 h39.37 r270